# EAGLE board LR2021_module_elecrow (EAGLE 9.6.2)
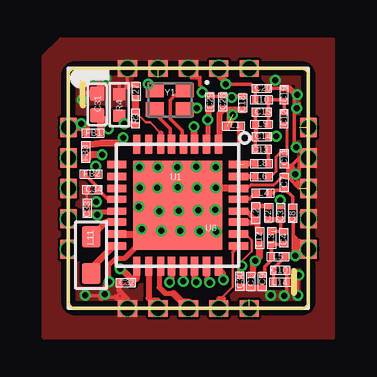
[diagram p0: board, top side]
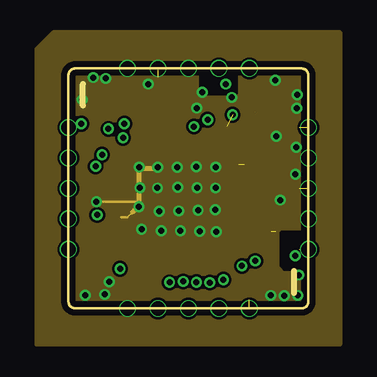
[diagram p1: board, inner layer Route2]
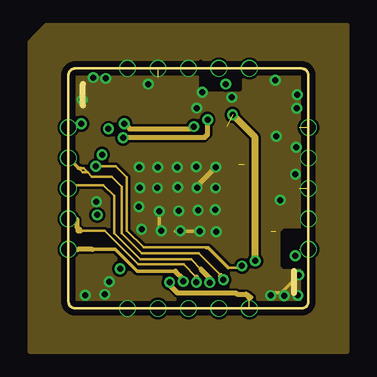
[diagram p2: board, inner layer Route15]
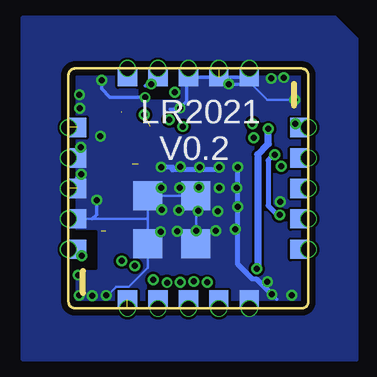
[diagram p3: board, bottom side, seen from below]

Size 10 x 10 mm. Coordinates in mm from the lower left corner, seen from the top.
Outline: 0,9.7 arc-90 0.3,10 9.7,10 arc-90 10,9.7 10,0.3 arc-90 9.7,0 0.3,0 arc-90 0,0.3 0,9.7
Copper layers (1+2*15+16): Top 0.035mm / dielectric 1.5mm / Route2 0.035mm / dielectric 0.15mm / Route15 0.035mm / dielectric 0.2mm / Bottom 0.035mm
Design rules "default *": minimum track width 4mil, minimum drill 0.2mm, track to track 4mil, track to pad 4mil, pad to pad 4mil, via to via 4mil, smd to smd 4mil, copper to edge 10mil, drill to drill 4mil, minimum pad ring 2mil, minimum via ring 4mil, stop-mask expansion 4mil, vias tented up to drill 10mil, thermal gap 10mil
Net classes: 1 50ohm: width 0.156 mm, drill 0.203 mm, clearance 0.469 mm
Milling: 2 lines

## Footprints (pad centres in the part's own frame; a part is rotated, then mirrored left to right if it is on the bottom)
C0201 = smd 0.25 x 0.3: P$1 -0.275,0; P$2 0.275,0
C0201' = smd 0.25 x 0.3: P$1 -0.229,0; P$2 0.229,0
C0402 = smd 0.6 x 0.6: 1 -0.45,0; 2 0.45,0
L0201 = smd 0.25 x 0.3: P$1 -0.275,0; P$2 0.275,0
L0603 = smd 0.889 x 0.762: 1 -0.762,0; 2 0.762,0
R0201 = smd 0.25 x 0.3: P$1 -0.275,0; P$2 0.275,0
0402 = smd 0.5 x 0.5: P$1 -0.45,0; P$2 0.45,0
10*10MM = drill 0.6 pad 0.7: 1 -5,2.54; 2 -5,1.27; 3 -5,0; 4 -5,-1.27; 5 -5,-2.54; 6 -2.54,-5; 7 -1.27,-5; 8 0,-5; 9 1.27,-5; 10 2.54,-5; 11 5,-2.54; 12 5,-1.27; 13 5,0; 14 5,1.27; 15 5,2.54; 16 2.54,5; 17 1.27,5; 18 0,5; 19 -1.27,5; 20 -2.54,5 | smd 0.75 x 0.8 bottom: P$1 -4.625,2.54; P$2 -4.625,1.27; P$3 -4.625,0; P$4 -4.625,-1.27; P$5 -4.625,-2.54; P$11 4.625,-2.54; P$12 4.625,-1.27; P$13 4.625,0; P$14 4.625,1.27; P$15 4.625,2.54 | smd 0.8 x 0.75 bottom: P$6 -2.54,-4.625; P$7 -1.27,-4.625; P$8 0,-4.625; P$9 1.27,-4.625; P$10 2.54,-4.625; P$16 2.54,4.625; P$17 1.27,4.625; P$18 0,4.625; P$19 -1.27,4.625; P$20 -2.54,4.625 | smd 0.7 x 0.8: P$21 -5,2.54; P$22 -5,1.27; P$23 -5,0; P$24 -5,-1.27; P$25 -5,-2.54; P$31 5,-2.54; P$32 5,-1.27; P$33 5,0; P$34 5,1.27; P$35 5,2.54 | smd 0.8 x 0.7: P$26 -2.54,-5; P$27 -1.27,-5; P$28 0,-5; P$29 1.27,-5; P$30 2.54,-5; P$36 2.54,5; P$37 1.27,5; P$38 0,5; P$39 -1.27,5; P$40 -2.54,5 | smd 1.2 x 1.2 bottom: P$41 -0.3,-0.3; P$42 1.7,-0.3; P$43 -0.3,-2.3; P$44 1.7,-2.3
LR2021_QFN32 = smd 0.8 x 0.305: P1 -2.54,1.7; P2 -2.54,1.2; P3 -2.54,0.7; P4 -2.54,0.25; P5 -2.54,-0.25; P6 -2.54,-0.7; P7 -2.54,-1.2; P8 -2.54,-1.7; P17 2.54,-1.7; P18 2.54,-1.2; P19 2.54,-0.7; P20 2.54,-0.25; P21 2.54,0.25; P22 2.54,0.7; P23 2.54,1.2; P24 2.54,1.7 | smd 0.305 x 0.8: P9 -1.7,-2.54; P10 -1.2,-2.54; P11 -0.7,-2.54; P12 -0.25,-2.54; P13 0.25,-2.54; P14 0.7,-2.54; P15 1.2,-2.54; P16 1.7,-2.54; P25 1.7,2.54; P26 1.2,2.54; P27 0.7,2.54; P28 0.25,2.54; P29 -0.25,2.54; P30 -0.7,2.54; P31 -1.2,2.54; P32 -1.7,2.54 | smd 3.7 x 3.7: P$33 0,0
PA-0.5MM = smd 0.508 x 0.508: P$1 0,0
X322540MPB4SI_40MHZ_X322540MPB4SI = smd 0.75 x 0.6: 1 -0.625,-0.4; 2 0.625,-0.4; 3 0.625,0.4; 4 -0.625,0.4

## Placement (x,y rotation side)
C1  47pF±5%  [C0201]  7.62,1.12 90 top
C2  22pF±5%  [C0201]  8.33,3.98 270 top
C3  7.5pF±5%  [C0201]  8.84,3.98 270 top
C4  1.8pF±5%  [C0201]  8.96,2.95 270 top
C7  2.2pF±5%  [C0201]  9.01,5.25 90 top
C8  12pF±5%  [C0201]  9.34,3.97 270 top
C9  3.9pF±5%  [C0201]  8.1,1.12 90 top
C10  1.8pF±5%  [C0201]  8.82,1.59 180 top
C11  47pF±5%  [C0201]  9.01,6.24 90 top
C12  18pF±5%  [C0201]  9,7.9 90 top
C13  6.8pF±5%  [C0201]  8.05,6.62 180 top
C14  2.7pF±5%  [C0201]  8.05,7.16 0 top
C15  1.1pF±5%  [C0201]  8.05,8.18 0 top
C18  47pF±5%  [C0201]  7.25,8.56 270 top
C19  1.2pF±5%  [C0201]  9,8.9 90 top
C20  2.0pF±5%  [C0201]  8.05,9.17 0 top
C27  47nF±5%  [C0201]  2.81,9.04 270 top
C28  1nF  [C0201]  6.45,8.6 90 top
C29  2.2uF  [C0201]  5.91,8.6 90 top
C30  NC  [C0201']  7.16,1.14 90 top
C31  4.7uF  [C0402]  1.2,8.5 270 top
C32  0.1uF  [C0201]  2.39,1.08 0 top
C33  2.2uF  [C0201']  0.77,4.17 270 top
C34  2.2uF  [C0201']  0.99,4.95 0 top
FB1  50R/100M  [L0201]  1.03,7.3 0 top
FB2  50R/100M  [L0201]  0.94,5.6 0 top
FB3  50R/100M  [L0201]  0.71,6.52 270 top
L1  18nH ±0.2  [L0201]  6.88,7.6 0 top
L2  4.7nH ±0.2  [L0201]  7.82,3.98 90 top
L3  3.9nH ±0.2  [L0201]  8.45,2.94 270 top
L4  24nH ±0.2  [L0201]  8.1,4.8 0 top
L5  7.5nH ±0.2  [L0201]  8.74,2.15 0 top
L6  2.4nH ±0.2  [L0201]  8.05,5.49 0 top
L8  1.5nH ±0.2  [L0201]  8.05,6.04 0 top
L9  1.6nH ±0.2  [L0201]  8.05,7.67 0 top
L10  1.1nH ±0.2  [L0201]  8.05,8.69 180 top
L11  2.2uH  [L0603]  0.95,2.22 270 top
L12  12nH ±0.2  [L0201]  7.95,2.94 270 top
L14  22nH ±0.2  [L0201]  8.83,1.08 180 top
R3  120k  [R0201]  2.81,7.91 90 top
R4  ERT-JZER104F  [0402]  2.12,8.48 270 top
U1  [10*10MM]  5,5 0 top
U$8  LR2021  [LR2021_QFN32]  4.55,4.3 270 top
U$15  PA-1-0.5  [PA-0.5MM]  0.44,9.55 0 top
Y1  FTR5238-A0-32M_QESM10 1.6x1.2mm  [X322540MPB4SI_40MHZ_X322540MPB4SI]  4.23,8.69 180 top

## Library data of the parts
C1-C4 C7-C15 C18-C20 C27-C29 C31 C32 FB1-FB3 L1-L6 L8-L12 L14 R3 = SX1302_Module
C30 C33 C34 = ESP32-P4 Display 10.1 inch V0.1
R4 U$8 = DW1000
U1 = LORA_LR1110_0.0
U$15 = DFN8
Y1 = ESP32-P4 Display 10.1 inch V0.1; DESCRIPTION: SMD Crystal Resonators 40MHz +/-10ppm SMD-3225_4P RoHS; HEIGHT: 0.8mm; MANUFACTURER_NAME: Yangxing Tech; MANUFACTURER_PART_NUMBER: X322540MPB4SI

## Nets
ANT_HF: C20.P$1 L10.P$2 U1.17 U1.P$17 U1.P$37
ANT_LF: C8.P$2 C10.P$2 L5.P$2 L14.P$2 U1.11 U1.P$11 U1.P$31
DIO5: U1.8 U1.P$8 U1.P$28 U$8.P19
DIO6: U1.7 U1.P$7 U1.P$27 U$8.P18
GND: C1.P$1 C3.P$1 C7.P$2 C9.P$1 C10.P$1 C11.P$1 C14.P$2 C18.P$1 C19.P$2 C20.P$2 C27.P$1 C28.P$2 C29.P$2 C30.P$1 C31.1 C32.P$1 C33.P$1 C34.P$1 L14.P$1 R4.P$1 U1.6 U1.12 U1.13 U1.14 U1.18 U1.19 U1.20 U1.P$6 U1.P$12 U1.P$13 U1.P$14 U1.P$18 U1.P$19 U1.P$20 U1.P$26 U1.P$32 U1.P$33 U1.P$34 U1.P$38 U1.P$39 U1.P$40 U1.P$41 U1.P$42 U1.P$43 U1.P$44 U$8.P15 U$8.P30 U$8.P$33 Y1.2 Y1.4
LR_BUSY: U1.9 U1.P$9 U1.P$29 U$8.P25
LR_MISO: U1.5 U1.P$5 U1.P$25 U$8.P21
LR_MOSI: U1.4 U1.P$4 U1.P$24 U$8.P22
LR_NRESET: U1.10 U1.P$10 U1.P$30 U$8.P20
LR_NSS: U1.2 U1.P$2 U1.P$22 U$8.P24
LR_SCK: U1.3 U1.P$3 U1.P$23 U$8.P23
LXA: L11.2 U$8.P16
LXB: L11.1 U$8.P14
N$1: C13.P$1 L8.P$2
N$2: C2.P$1 L2.P$2
N$3: FB1.P$1 U1.1 U1.P$1 U1.P$21
N$5: L6.P$1 U$8.P31
N$6: L1.P$2 L8.P$1 U$8.P32
N$8: C12.P$2 C15.P$2 C19.P$1 L9.P$2 L10.P$1
N$9: C11.P$2 C12.P$1 L6.P$2
N$10: L2.P$1 L12.P$1 U$8.P27 U$8.P28
N$11: C13.P$2 C14.P$1 C15.P$1 L9.P$1
N$12: L4.P$1 U$8.P29
N$13: C7.P$1 C8.P$1 L4.P$2
N$15: C34.P$2 FB2.P$1 U$8.P12
N$16: C2.P$2 C3.P$2 C4.P$1 L3.P$1
N$17: C33.P$2 FB3.P$2 U$8.P13
N$18: C4.P$2 C9.P$2 L3.P$2 L5.P$1
NTC: R3.P$1 R4.P$2 U$8.P3
TX/RX_EN: U1.15 U1.P$15 U1.P$35
VDCC: C30.P$2 FB2.P$2 U$8.P26
VDD_3V3: C31.2 C32.P$2 FB1.P$2 U$8.P17
VNTC: C27.P$2 R3.P$2 U$8.P6
VPAX: C29.P$1 FB3.P$1 U$8.P2
VR-PA: C1.P$2 C18.P$2 C28.P$1 L1.P$1 L12.P$2 U$8.P1
XTA: U$8.P4 Y1.1
XTB: U$8.P5 Y1.3

## Tracks (layer width: path | path; a pad name or v marks a point on that pad's centre or on a via)
ANT_HF  (via drill 0.25)
  Top 0.152: U1.17 6.43,10 | L10.P$2 C20.P$1 7.62,9.33 6.76,9.33 | U1.17 6.37,9.9 6.37,9.85 | 6.76,9.33 6.27,9.82 U1.17 | 6.76,9.33 6.57,9.33 v6.55,9.35 U1.P$17
  Bottom 0.152: U1.P$17 6.46,9.62 6.8,9.28 6.62,9.28 v6.55,9.35
ANT_LF  (via drill 0.25)  (1 unrouted)
  Top 0.102: 9.38,3.65 C8.P$2 | 9.63,2.81 9.63,2.64
  Top 0.12: 9.99,2.08 9.59,2.48 | 9.63,2.81 9.63,2.64 9.63,2.46
  Top 0.152: 9.62,2.21 9.59,2.19 9.73,2.19 U1.11 | 9.62,2.83 9.62,2.73 | C8.P$2 9.37,3.66 9.37,3.05 | 9.58,2.4 9.49,2.49 9.49,2.93 9.37,3.05 | 9.08,2.21 L5.P$2 9.04,2.13 8.74,1.86 8.54,1.67 C10.P$2 8.55,1.58 L14.P$2 | 9.62,2.21 9.31,2.21 9.37,2.27 9.37,2.53 | 9.37,3.05 9.37,2.98 | 9.37,2.98 9.62,2.73 | 9.62,2.73 9.62,2.36 | 9.62,2.28 9.62,2.21 | 9.37,2.98 9.37,2.53 | 9.37,2.53 9.62,2.28 | v9.45,2.19 9.62,2.36 | 9.62,2.28 9.62,2.36
  Top 0.2: 9.59,2.19 9.59,2.48 | 9.62,2.48 9.64,2.46 U1.11
  Top 0.3: 9.08,2.21 9.31,2.21
  Bottom 0.2: U1.P$11 U1.11
DIO5
  Top 0.1: 5.08,0.33 5.02,0.33
  Top 0.102: U$8.P19 3.78,1.69 | 4.64,0.36 4.94,0.36 | 4.94,0.36 5,0.36 | 5,0.05 5,0.3 4.94,0.36
  Top 0.152: 4.88,0 U1.8 | U1.8 5,0.05 | U1.8 5,0.25 5.08,0.33
  Top 0.2: 3.78,1.69 3.78,0.88 4.03,0.63 4.37,0.63
  Top 0.3: 4.64,0.36 4.37,0.63
  Bottom 0.102: U1.P$8 5,0.36
  Bottom 0.152: U1.P$8 U1.8
DIO6
  Top 0.102: U$8.P18 | 3.34,0.44 3.42,0.36
  Top 0.152: 3.73,0.36 U1.P$27
  Top 0.2: 3.42,0.36 3.73,0.36
  Top 0.25: U$8.P18 3.34,0.44
  Bottom 0.102: U1.P$7 3.73,0.36
  Bottom 0.152: U1.P$7 U1.P$27
GND  (via drill 0.25)  (2 unrouted)
  Top 0.102: v1.52,0.58 1.41,0.47 | 2.5,9.32 2.4,9.32 | C33.P$1 0.76,4.43 | 0.76,4.43 C34.P$1 | v1.17,4.45 1.15,4.43 0.76,4.43 | 5.25,5 U$8.P$33
  Top 0.12: 9.26,5.83 9.12,5.96 C11.P$1 | 9.26,5.53 C7.P$2 | 7.46,5 7.62,5.16 8.57,5.16 8.93,5.53
  Top 0.15: C32.P$1 2.12,0.62 1.96,0.47 1.36,0.47 | v9.49,6.72 9.4,6.8 9.4,8.38 9.4,8.65 | 3.51,9.14 Y1.2 | 1.35,9.38 2.12,9.38 R4.P$1 2.5,9.32 | 2.4,9.32 2.46,9.38 U1.P$20
  Top 0.152: 1.48,9.3 1.33,9.15 1.13,8.95 | 9.57,5.25 9.62,5.2 U1.P$13 9.2,5.42 C7.P$2 8.93,5.53 | v1.71,1.12 1.52,0.93 v1.52,0.58 1.47,0.53 0.65,0.53 0.66,0.54 v0.7,0.54 | C1.P$1 7.6,0.86 | U1.6 2.46,-0.06 | 3.79,3.54 v3.79,4.05 3.79,4.12 3.96,4.3 U$8.P$33 | v9.55,0.54 9.55,1.16 9.69,1.3 v9.6,1.39 | v8.82,4.51 8.84,4.5 C3.P$1 | U1.P$38 5.38,9.62 | C28.P$2 | C18.P$1 7.22,8.87 | U$8.P$33 5.62,3.23 5.62,3.21 v5.47,3.21 | 9.4,8.91 9.4,8.65 9.41,8.66 | 9.18,9.19 C19.P$2 C20.P$2 | 9.4,8.38 9.55,8.53 9.62,8.53 | C14.P$2 8.41,7.17 v8.67,7.17 | U$8.P30 7.46,5 | C18.P$1 6.49,8.84 C28.P$2 | C18.P$1 5.95,8.84 C29.P$2 5.48,9.31 5.48,9.62 5.12,9.62 | C9.P$1 8.12,0.84 v8.43,0.54 8.56,0.67 | C30.P$1 7.21,0.86 | v6.81,8.79 6.72,8.88 C28.P$2 | C11.P$1 9.31,5.96 U1.P$14 9.62,5.75 v9.46,5.59 | U$8.P$33 3.56,3.31 v3.05,3.31 | 9.4,8.91 v9.53,8.91 v9.54,8.9 | C10.P$1 L14.P$1 9.11,0.64 v9,0.53 | 9.4,8.97 9.4,8.91 | 1.35,9.38 0.92,9.38
  Top 0.2: U1.14 9.55,6.72 v9.49,6.72 | U1.P$32 9.74,3.99 | 3.45,3.1 3.6,2.95 4.55,3.9 U$8.P$33 | Y1.2 3.56,9.11 v3.32,9.35 | Y1.4 5.29,8.29 v5.35,8.35 | U$8.P30 | 9.52,5.2 9.57,5.25 | C32.P$1 2.12,0.75 2.46,0.41 2.06,0.41 1.99,0.47 1.96,0.47 | 3.79,3.54 2.33,2.08 1.97,2.08 1.66,1.77 1.66,0.96 1.35,0.64 1.35,0.41 1.36,0.42 1.36,0.47 1.41,0.47 v1.52,0.58
  Top 0.25: C27.P$1 2.5,9.32 | 9.18,9.19 9.4,8.97
  Top 0.3: v0.57,8.69 0.83,8.95 C31.1 1.13,8.95 | v1.55,9.58 1.35,9.38 | 1.33,9.36 1.33,9.15 | U$8.P15 3.45,3.1 | U$8.P30 5.25,5 | C9.P$1 C1.P$1 | 7.6,0.86 7.21,0.86
  Top 0.4: 9.26,5.83 9.26,5.53
  Route2 0.102: 2.21,3.8 2.46,3.8 2.67,4.01 2.92,4.25 v2.94,4.23 | 2.95,4.55 2.85,4.45 v1.17,4.45
  Route2 0.152: v5.33,5.9 | v6.13,5.02
  Route2 0.2: v2.95,5.89 3,5.84 3.68,5.84 v3.72,5.88 | 2.85,5.79 v2.95,5.89 | 2.67,4.01 2.95,4.29 2.95,4.55 v2.95,5.89
  Route15 0.152: v9.6,1.39 8.87,0.66 | 8.87,0.66 9.03,0.66 9,0.63 v9,0.53 | 8.87,0.66 8.43,0.66 v8.43,0.54 | v5.47,3.21 4.46,3.21 4.49,3.24 v4.67,3.24 | v3.79,4.05 3.79,3.29 3.78,3.28 3.73,3.33 3.75,3.35 v3.87,3.24
  Route15 0.2: v6.14,5.89 5.36,5.11 v5.36,5.03
  Bottom 0.102: 2.46,9.64 U1.P$20 | 6.7,3.71 U1.P$44 6.7,1.69 7.49,0.9 8,0.9 8.38,0.53 | 6.7,3.71 U1.P$42 | U1.P$42 U1.P$41 4.67,4.67 v4.67,3.24 4.67,2.73 U1.P$43 | U1.P$12 9,3.73 6.72,3.73 6.7,3.71 | U1.P$20 2.46,9.43 | 2.41,9.37 1.73,8.69 v0.57,8.69 | U1.P$20 3.89,9.62 | U1.P$42 6.38,5.02 v6.13,5.02
  Bottom 0.15: U1.P$18 3.89,9.62 U1.P$19 U1.P$20 2.73,9.35 v3.32,9.35 | v5.35,8.35 5.4,8.3 5.75,8.3
  Bottom 0.152: 9,3.73 8.82,3.91 v8.82,4.51 | v1.52,0.58 1.32,0.38 | U1.P$12 U1.P$32 | 4.55,5.03 v4.56,5.04 | v5.35,8.35 5.07,8.63 5.07,9.55 | U1.P$18 5.07,9.56 5.07,9.55 | 5.07,9.55 U1.P$18 U1.P$38 | U1.P$19 2.48,9.62 2.46,9.64 | 2.41,9.37 2.46,9.43 U1.20 | v6.81,8.79 v6.82,8.8 8.27,8.8 8.61,9.14 v8.61,9.5
  Bottom 0.2: v1.52,0.58 2.16,1.22 2.33,1.22 2.95,1.84 v2.95,5.89 | v3.72,5.88 3.83,5.77 5.67,5.77 5.67,5.89 v6.14,5.89 | U1.P$41 5.03,5.03 v5.36,5.03 | U1.P$13 9.62,5.43 v9.46,5.59 | U1.P$6 U1.6
  other vias: 4.6,4.06 3.71,5.02 6.11,4.11 5.4,4.09 4.54,5.89 5.57,9.01 6.16,3.2 2.98,5.02 9.52,8.34 1.03,9.62
  pour Top (no thermals): -1,-1.2 -1,10.5 -0.3,11.2 11,11.2 11,-1.2
  pour Route2 (no thermals): -1.2,10.9 -0.6,11.5 11.3,11.5 11.3,9.1 11.3,-1.4 11.3,-1.5 -1.3,-1.5 -1.3,10.8
  pour Route15 (no thermals): -1.3,11.4 -0.9,11.8 0.2,11.8 11.6,11.8 11.6,-1.8 -1.6,-1.8 -1.6,11.1
  pour Bottom (no thermals): -1.5,11.7 -1.1,12.1 -0.1,12.1 11.9,12.1 11.9,-2.1 -2,-2.1 -2,11.2
  cutout Top: 2.62,9.42 2.62,7.29 2.64,7.27 5.47,7.27 5.48,7.26 5.48,9.35 5.16,9.67 2.87,9.67
  cutout Top: 1.21,7.6 1.21,1.15 1.23,1.13 6.35,1.13 6.94,1.72 6.94,0.79 9.04,0.79 9.04,1.72 9.98,1.72 9.98,3.83 9.63,4.18 9.63,4.84 9.35,5.12 9.35,5.76 9.52,5.93 9.42,9.14 9.41,9.3 9.52,5.95 9.42,9.14 9.28,9.28 8.28,9.28 7.82,9.74 7.31,9.74 7.27,9.7 5.58,9.7 5.58,7.11 5.65,7.04 5.36,6.75 2.06,6.75
  cutout Bottom: 5.41,10.06 5.41,8.79 5.43,8.77 6.93,8.77 7,8.84 7,10.05 6.98,10.07 5.42,10.07
  cutout Bottom: 10.02,3.2 8.86,3.2 8.86,1.67 10.07,1.67 10.07,3.15
  cutout Route2: 8.87,3.16 8.87,1.77 8.97,1.67 9,1.64 10.07,1.64 10.02,1.69 10.02,3.15 10,3.17 8.89,3.17
  cutout Route15: 8.9,3.14 8.9,1.78 8.97,1.71 10.11,1.71 10.15,1.75 10.15,3.2 10.09,3.26 8.99,3.26 8.91,3.18
  cutout Route15: 5.52,10.3 5.52,9.18 5.59,9.11 7.14,9.11 7.16,9.13 7.16,10.19 7.13,10.22 5.55,10.22 5.53,10.2
  cutout Route2: 5.51,10.09 5.51,8.98 5.54,8.95 6.98,8.95 7,8.97 7,10.11 6.98,10.13 5.54,10.13 5.53,10.12
LR_BUSY
  Top 0.1: 6.39,0.45 6.84,0.9 6.84,2.35
  Top 0.15: U$8.P25 6.84,2.35
  Top 0.152: 6.44,0.38 U1.P$9 | U1.9 6.27,0.21 6.44,0.38 | 6.44,0.38 6.47,0.42 6.44,0.45 6.39,0.45
  Top 0.2: 6.46,0.41 6.27,0.41 U1.P$9 U1.9
  Bottom 0.102: 6.54,0.36 6.52,0.38 6.46,0.38 U1.P$9 6.27,0.36
  Bottom 0.152: 6.4,0.31 6.27,0.18 U1.9 U1.P$9 6.33,0.38 6.4,0.31 | 6.4,0.31 6.46,0.38
  Bottom 0.2: 6.27,0.22 U1.9
LR_MISO  (via drill 0.25)
  Top 0.102: U$8.P21 4.8,1.04
  Top 0.2: U$8.P21 4.8,1.14 v4.78,1.12
  Route15 0.15: 4.78,1.22 v4.78,1.12 | 4.46,1.55 2.86,1.55 1.95,2.46 1,2.46 | 0.41,2.46 U1.P$5
  Route15 0.2: 4.46,1.55 4.78,1.23 4.78,1.22 | 1,2.46 0.41,2.46 U1.P$25
  Bottom 0.2: U1.P$5 U1.P$25
LR_MOSI  (via drill 0.25)
  Top 0.2: U$8.P22 5.25,1.18 v5.33,1.09
  Route15 0.1: 5.33,1.3 4.81,1.83 2.91,1.83 1.51,3.23 0.51,3.23 | 0.44,3.23 0.46,3.23
  Route15 0.102: 0.46,3.23 0.46,3.27 0.36,3.37 | U1.P$24 0.2,3.73 0.35,3.58
  Route15 0.15: 0.51,3.23 0.5,3.23 0.38,3.35
  Route15 0.2: v5.33,1.09 5.33,1.3 | 0.44,3.23 0.41,3.26 | 0.41,3.23 0.46,3.23 0.51,3.23 0.35,3.39 0.35,3.58 0.35,3.7 | U1.P$24 0.13,3.86
  Bottom 0.2: U1.P$4 U1.P$24
LR_NRESET  (via drill 0.25)  (1 unrouted)
  Top 0.2: U$8.P20 4.3,1.17 v4.21,1.08
  Route15 0.102: 7.03,0.6 7.52,0.6 7.65,0.47 7.54,0.36 | 7.54,0.36 7.54,0.41 | U1.10 7.54,0.36
  Route15 0.2: v4.21,1.08 4.21,0.97 4.55,0.64 6.99,0.64 7.03,0.6 7.4,0.6 7.54,0.46 7.54,0.41
  Bottom 0.102: 7.54,0.36 U1.P$10 7.63,0.47 7.65,0.47
  Bottom 0.2: U1.P$10 7.62,0.45
LR_NSS  (via drill 0.25)
  Top 0.2: U$8.P24 6.46,1.46 v6.46,1.2
  Route15 0.1: 6.35,1.38 5.44,2.29 3.06,2.29 2.21,3.13
  Route15 0.102: 0.52,5.85 0.63,5.85 0.81,5.67 0.8,5.67 | 0.36,5.91 0.38,5.89 | 0.8,5.67 0.6,5.67 0.42,5.85 | 2.21,3.13 2.21,5.04 2.23,5.05 2.23,5.07 1.81,5.49 0.98,5.49 0.8,5.67
  Route15 0.152: 0.52,5.85 0.42,5.85 0.38,5.89 U1.P$22
  Route15 0.2: v6.46,1.2 6.35,1.31 6.35,1.38
  Bottom 0.102: 0.36,6.27 U1.P$2
  Bottom 0.152: U1.P$22 U1.P$2
LR_SCK  (via drill 0.25)
  Top 0.2: U$8.P23 5.76,1.21 v5.89,1.08
  Route15 0.1: 5.55,1.6 5.51,1.63 5.11,2.04 3,2.04
  Route15 0.102: 3,2.04 1.91,3.13 1.91,4.69 1.46,5.14 0.2,5.14 0.18,5.12
  Route15 0.15: 0.18,5.12 0.18,5.18
  Route15 0.2: 0.18,5.18 U1.3 | 5.51,1.63 5.89,1.26 v5.89,1.08
  Bottom 0.2: U1.P$3 U1.3
LXA
  Top 0.2: U$8.P16 1.87,2.6 | L11.2 0.91,1.64
  Top 0.3: 1.87,2.6 0.91,1.64
LXB
  Top 0.2: 0.95,2.99 L11.1
  Top 0.25: U$8.P14 1.55,3.59 0.95,2.99
  Top 0.28: U$8.P14
N$1
  Top 0.152: C13.P$1 L8.P$2
N$2
  Top 0.2: C2.P$1 L2.P$2
N$3  (via drill 0.25)
  Top 0.152: 0.71,7.28 0.46,7.54 | FB1.P$1 0.75,7.47 v0.54,7.69 0.6,7.63 0.6,7.54 0.46,7.54 | 0.78,7.34 0.71,7.41 | U1.P$21 0.46,7.54
  Top 0.3: U1.P$21 0.6,7.54 | v0.54,7.69 0.78,7.45 0.78,7.34 | 0.71,7.41 0.71,7.28
  Bottom 0.152: U1.P$1 v0.54,7.69
  Bottom 0.3: U1.P$1 U1.P$21
N$5
  Top 0.2: U$8.P31 7.82,5.5 L6.P$1
N$6  (1 unrouted)
  Top 0.152: L8.P$1 | L1.P$2 7.09,7.69 U$8.P32
  Top 0.2: 7.38,6.05 7.33,6 | 7.12,6.03 U$8.P32
  Top 0.25: L8.P$1 7.12,6.03
N$8
  Top 0.152: L9.P$2 C15.P$2 L10.P$1 8.94,8.69 C19.P$1 C12.P$2
N$9
  Top 0.12: L6.P$2 8.43,5.49 8.65,5.71 8.65,6.32 8.85,6.51 C11.P$2 9.09,6.59 9.09,7.67 C12.P$1
  Top 0.152: L6.P$2 8.39,5.5
N$10
  Top 0.12: L2.P$1 7.86,3.71 7.93,3.63 7.93,3.44 7.93,3.25
  Top 0.152: 7.79,3.6 7.82,3.57 7.86,3.53 | L12.P$1 7.93,3.24 7.93,3.44
  Top 0.2: U$8.P28 7.45,4.04 7.79,3.71 L2.P$1 7.82,3.57 | U$8.P27 7.25,3.66 | 7.86,3.33 7.86,3.53
  Top 0.25: U$8.P27 7.79,3.6
N$11  (1 unrouted)
  Top 0.152: C14.P$1 7.83,7.15 7.83,7.61 L9.P$1 | 7.83,8.12 7.81,8.13 7.79,8.17 | L9.P$1 7.83,7.71 | L9.P$1 C14.P$1 | C15.P$1 L9.P$1 | C14.P$1 C13.P$2
N$12
  Top 0.15: 7.11,4.57 7.55,4.57 7.79,4.8
  Top 0.2: U$8.P29 7.11,4.57 | L4.P$1 7.79,4.8
N$13
  Top 0.152: C7.P$1 8.96,4.92 8.64,4.92 8.53,4.8 L4.P$2 | C8.P$1 9.34,4.64 C7.P$1 | C7.P$1
N$15
  Top 0.102: U$8.P12 1.65,4.55 | C34.P$2 1.25,4.95
  Top 0.15: 1.65,4.55 1.25,4.95
  Top 0.152: C34.P$2 1.22,5.05 0.68,5.6 FB2.P$1
N$16  (1 unrouted)
  Top 0.152: 8.45,3.69 8.46,3.71 | L3.P$1 8.84,3.21 C3.P$2 | C4.P$1 8.95,3.21 8.64,3.21
  Top 0.2: C2.P$2 8.46,3.71 C3.P$2 8.66,3.71
N$17  (via drill 0.25)
  Top 0.102: C33.P$2 0.96,4.01 | C33.P$2 0.97,4.02 1.98,4.02 U$8.P13 | v1.2,3.9 v1.2,3.89 0.82,3.89 C33.P$2 | C33.P$2 0.97,3.94 1.26,4.05
  Top 0.15: U$8.P13 1.92,4.05 1.39,4.05
  Top 0.152: 0.78,6.25 FB3.P$2
  Top 0.2: 1.92,4.05 1.88,4.01 0.96,4.01
  Top 0.3: v1.4,6.41 1.25,6.41 0.94,6.41 0.78,6.25
  Bottom 0.102: 1.25,3.85 1.17,3.85 1.17,3.87 v1.2,3.9 | 1.46,6.39 1.41,6.39 v1.4,6.41
  Bottom 0.2: 1.25,3.85 1.68,4.29 1.68,6.17 1.46,6.39
N$18
  Top 0.152: L5.P$1 8.45,2.17 | C4.P$2 8.46,2.67 L3.P$2 | L3.P$2 | L5.P$1 L3.P$2 | C9.P$2 8.19,1.48 8.19,1.75 8.46,2.02 L5.P$1
NTC  (via drill 0.25)
  Top 0.1: R4.P$2 2.12,8.09
  Top 0.15: R3.P$1 2.77,7.68 | 2.29,7.81 2.22,7.81
  Top 0.2: 5.25,7.56 v5.23,7.58
  Top 0.25: 2.77,7.68 2.42,7.68
  Top 0.3: U$8.P3 5.25,7.56 | R4.P$2 2.12,7.98 2.29,7.81 2.42,7.68 | v2.33,7.7 2.22,7.81
  Route15 0.2: v5.22,7.59 v5.23,7.58 5.23,7.48 2.55,7.48 v2.33,7.7
TX/RX_EN  (1 unrouted)
VDCC  (via drill 0.25)
  Top 0.102: U$8.P26 7.38,3.1 7.62,2.86 7.62,2.84 7.64,2.82 7.64,2.38 7.23,1.97 v7.23,1.77
  Top 0.152: FB2.P$2 1.13,5.68 v1.13,5.92
  Top 0.3: v7.23,1.77 7.16,1.7 C30.P$2
  Route15 0.102: 5.75,2.52 5.77,2.54 3.13,2.54 2.43,3.24 2.43,5.47 1.97,5.93 1.14,5.93 v1.13,5.92 | 6.65,1.69 7.23,1.69
  Route15 0.15: 7.23,1.69 v7.23,1.77 | 5.75,2.52 5.82,2.52 6.65,1.69
VDD_3V3  (via drill 0.25)
  Top 0.102: C31.2 1.38,7.87 | FB1.P$2 1.38,7.38 | v1.67,7.48 1.65,7.5
  Top 0.12: C31.2 1.2,8.09
  Top 0.2: 2.83,1.25 C32.P$2 2.67,1.19 | 2.21,1.65 v2.15,1.65 | U$8.P17 2.83,1.74
  Top 0.3: 2.67,1.19 2.21,1.65 | 2.83,1.74 2.83,1.25 | 1.38,7.5 1.38,7.38
  Top 0.4: 1.38,7.87 1.38,7.5 1.65,7.5
  Top 0.508: C31.2 1.18,8.03
  Bottom 0.3: v2.15,1.65 2.12,1.68 2.12,6.41 1.67,6.86 v1.67,7.48
VNTC
  Top 0.102: 3.85,7.3 3.4,7.75 3.21,7.75 2.81,8.15 R3.P$2
  Top 0.2: U$8.P6 3.85,7.3
  Top 0.3: R3.P$2 C27.P$2
VPAX  (via drill 0.25)
  Top 0.102: v5.8,7.86 5.91,7.86 C29.P$1 | 2.08,6.91 2.13,6.91 | 2.33,7.11 v2.27,7.11
  Top 0.12: U$8.P2 5.81,7.21 | 5.81,8.23 C29.P$1
  Top 0.2: 5.81,8.23 5.81,7.21
  Top 0.3: FB3.P$1 0.79,6.79 1.38,6.89 2.11,6.89 2.13,6.91 2.33,7.11
  Route15 0.2: v2.27,7.11 5.66,7.11 5.8,7.25 v5.8,7.86
VR-PA  (via drill 0.25)  (1 unrouted)
  Top 0.12: C28.P$1
  Top 0.152: 7.22,8.31 C18.P$2 7.22,8.25 6.88,8.25 | L12.P$2 | 6.43,8.25 6.71,8.25 | 6.49,8.29 C28.P$1 6.59,8.32 v6.84,8.07 6.84,8.27 6.85,8.29 | 7.79,1.98 7.75,1.98 | v7.78,1.98 7.71,1.91 7.71,1.75
  Top 0.2: C1.P$2 7.71,1.48 | U$8.P1 6.29,6.88 | C18.P$2 6.85,8.29
  Top 0.24: 6.29,8.12 6.43,8.25
  Top 0.25: 7.71,1.48 7.71,1.75 7.71,1.94 | 6.29,8.12 6.29,6.88 | C18.P$2 6.49,8.29
  Top 0.3: 7.75,1.98 7.71,1.94 | L12.P$2 7.96,2.14 7.79,1.98 | 6.71,8.25 6.71,7.71 L1.P$1
  Route15 0.3: v6.84,8.07 7.78,7.13 v7.78,1.98
XTA
  Top 0.12: U$8.P4 4.76,7.04 | 4.82,8.88 Y1.1
  Top 0.152: U$8.P4 4.75,6.89 4.75,7.39 4.24,7.9 4.24,8.68 4.44,8.88 4.82,8.88
XTB
  Top 0.152: U$8.P5 4.25,6.89 4.25,7.48 3.56,8.17 Y1.3
  Top 0.2: Y1.3 3.56,8.3

## Text on the board
bPlace: LR2021 / V0.2
tNames: U8